# Altium PCB 20通道传感器-蓝牙主机.PcbDoc (part 1 of 2)
Units mil, origin at the board's own origin, x right, y up, seen from the top; angles counter-clockwise.
Board outline 5314.97 x 3394.43 mil, 2 copper layers (Top Layer, Bottom Layer); 93 components, 99 nets, 352 pads, 927 vias.
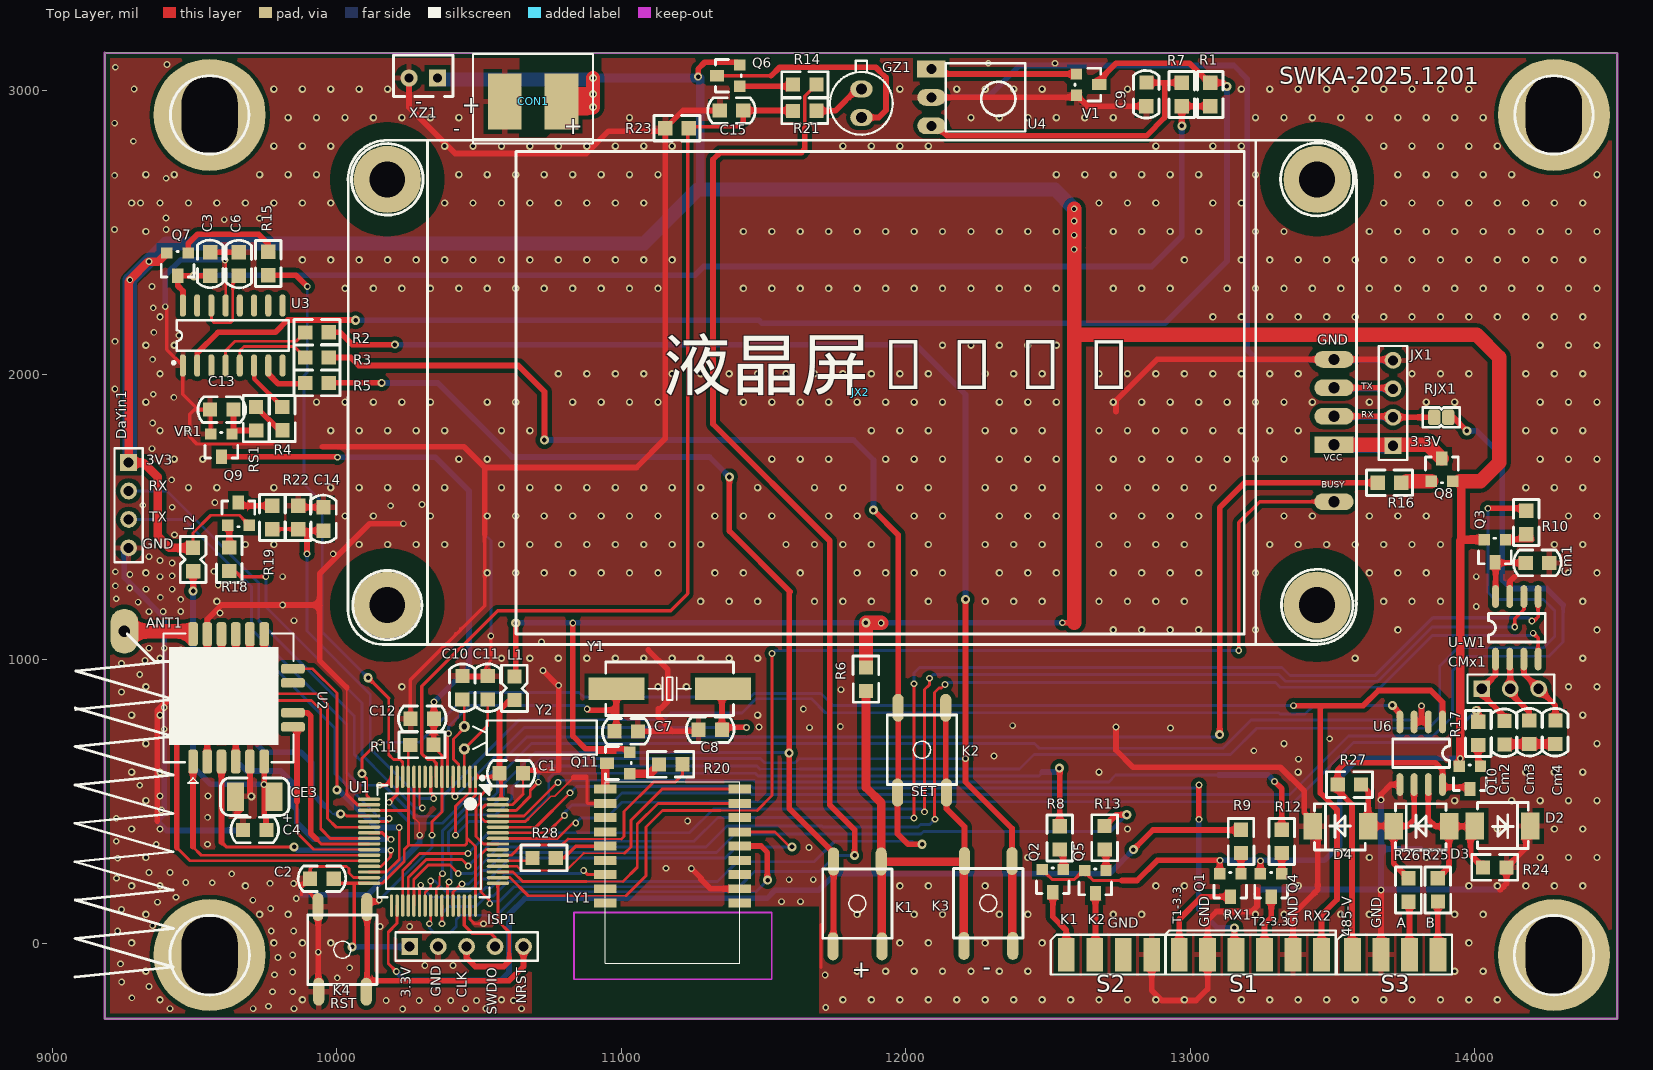
[diagram p0: Top Layer view]
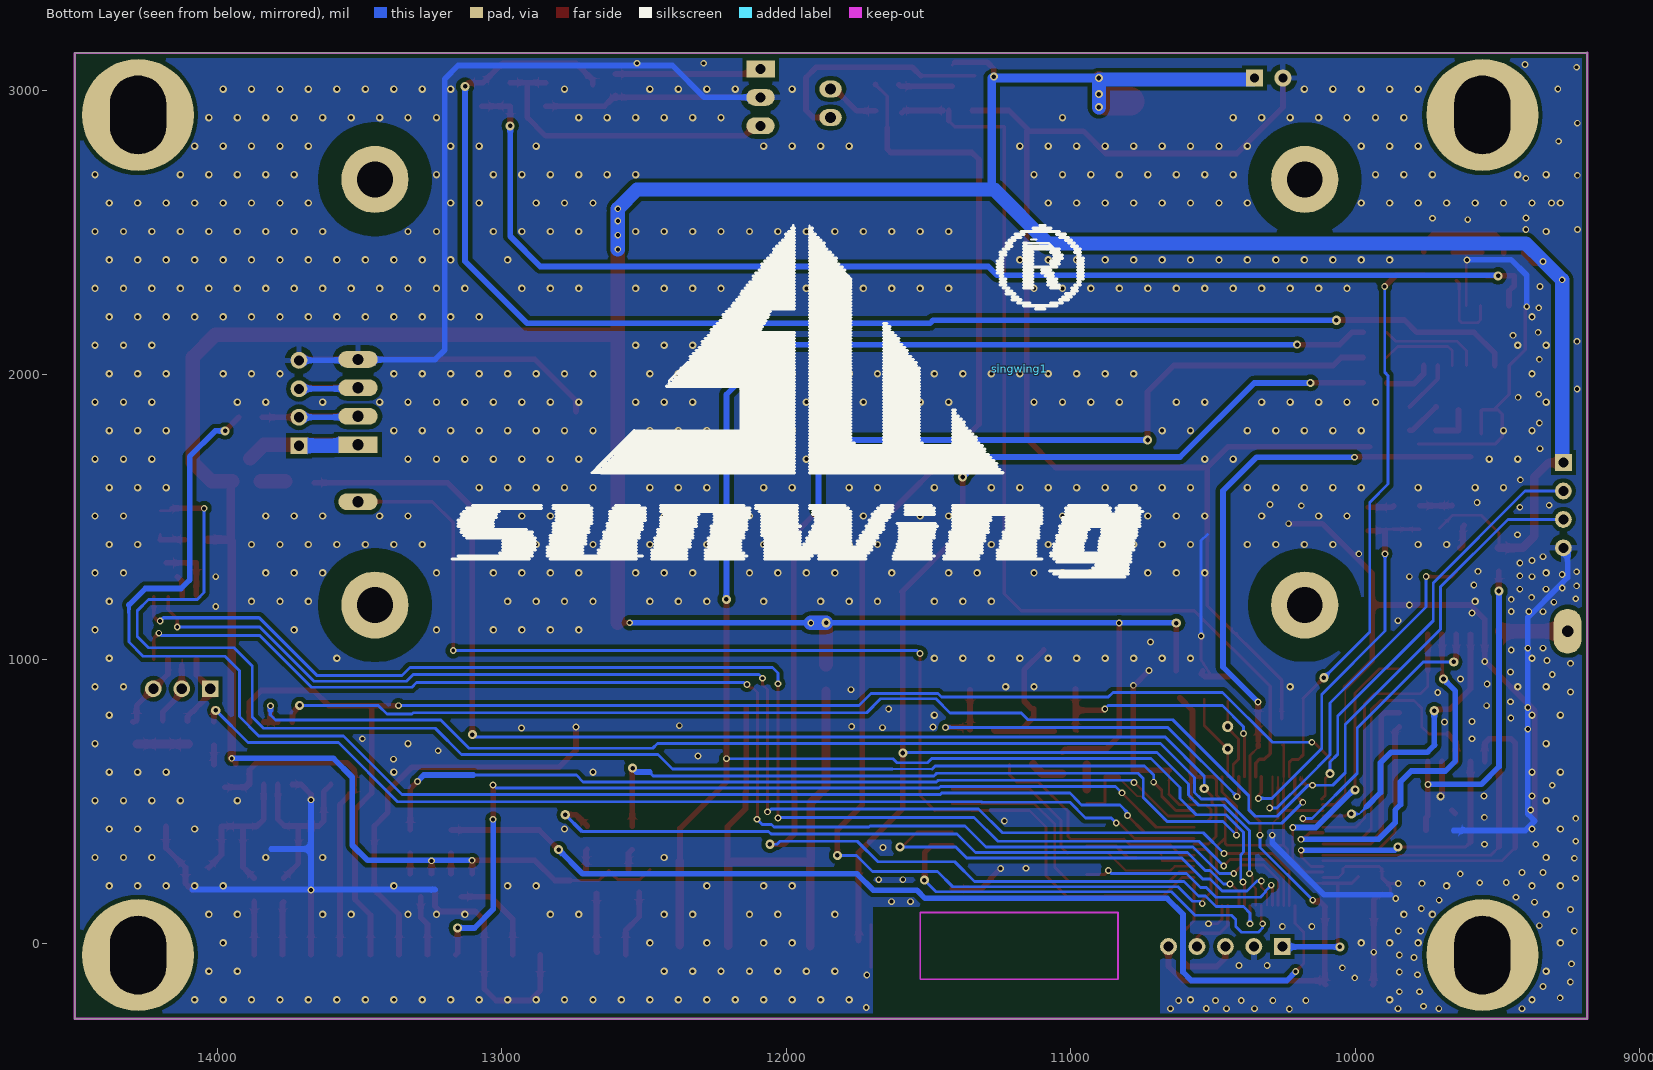
[diagram p1: Bottom Layer view, seen from below]
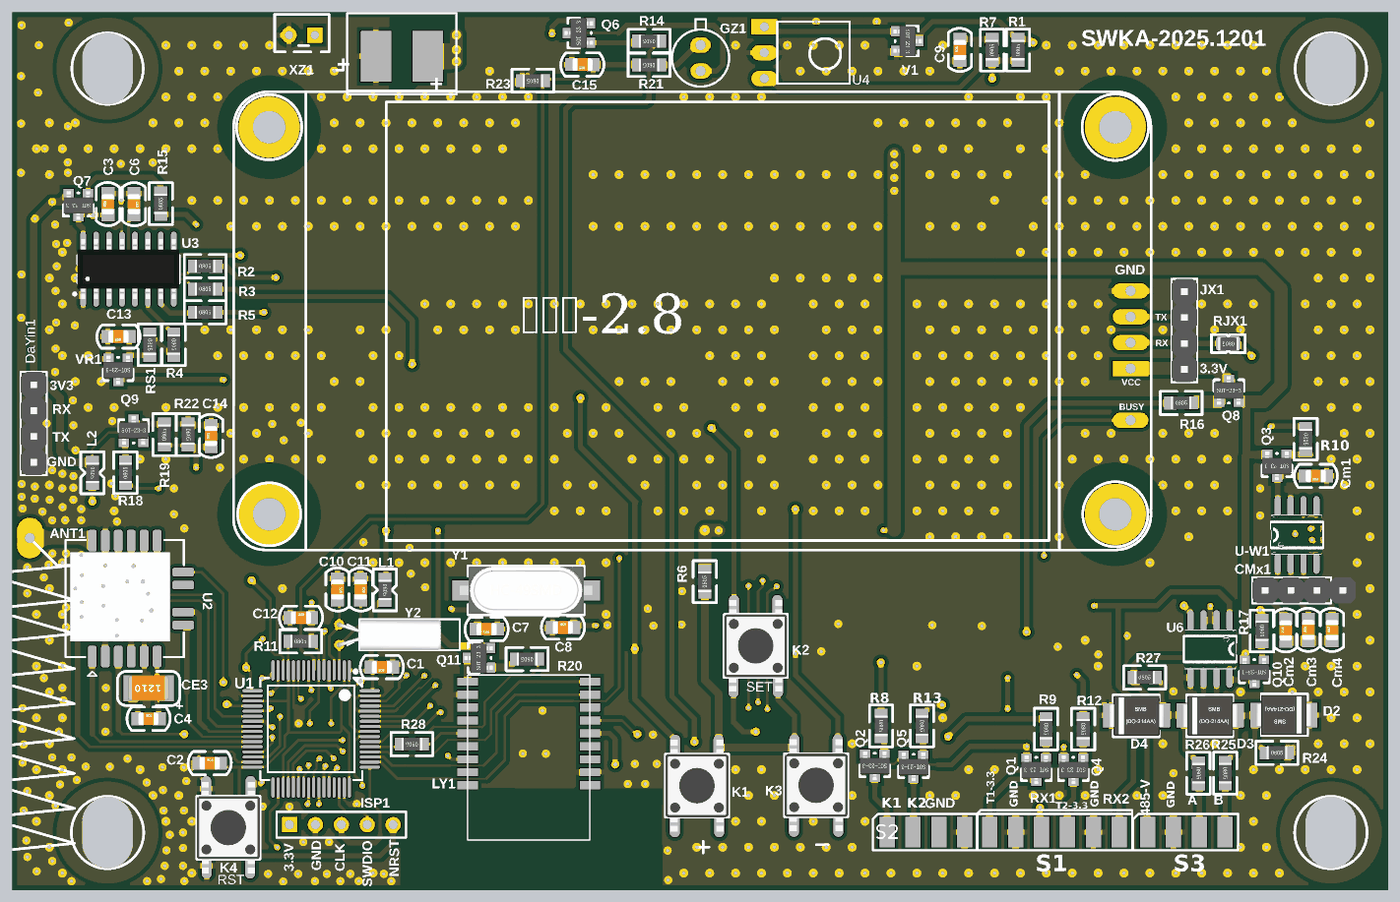
[diagram p3: 3D render of the assembled board from above, using the file's embedded part models]

## Layer stack, top to bottom
Top Solder: solder mask 0.4, Solder Resist, Dk 3.5
Top Layer: signal copper 1.4
Dielectric1: dielectric 12.6, FR-4, Dk 4.8
Bottom Layer: signal copper 1.4
Bottom Solder: solder mask 0.4, Solder Resist, Dk 3.5

## Board outline
9185.03,-263.71 14500,-263.71 14500,3130.3 9185.44,3130.3 9185.03,3130.72

## Design rules (kind name [scope] priority, off if disabled: settings)
Clearance [All] p1: gap=15 ignorepadtopadclearanceinfootprint=FALSE
ComponentClearance [All] p1: gap=10 collisioncheckmode=3 verticalgap=100000 showdistances=FALSE
DiffPairsRouting [All] p1: maxlimit=30 minlimit=20 mostfreqgap=20 toplayer_minwidth=15 toplayer_maxwidth=15 toplayer_prefwidth=15 bottomlayer_minwidth=15 bottomlayer_maxwidth=15 bottomlayer_prefwidth=15 substack1={B24A9CE2-429F-42C9-BC47-D9FC162F9FF9} toplayer_{b24a9ce2-429f-42c9-bc47-d9fc162f9ff9}_minwidth=15 toplayer_{b24a9ce2-429f-42c9-bc47-d9fc162f9ff9}_maxwidth=15 toplayer_{b24a9ce2-429f-42c9-bc47-d9fc162f9ff9}_prefwidth=15 bottomlayer_{b24a9ce2-429f-42c9-bc47-d9fc162f9ff9}_minwidth=15 bottomlayer_{b24a9ce2-429f-42c9-bc47-d9fc162f9ff9}_maxwidth=15 bottomlayer_{b24a9ce2-429f-42c9-bc47-d9fc162f9ff9}_prefwidth=15 substack2={82238B30-984B-4E9E-A5AC-798FF285C955} toplayer_{82238b30-984b-4e9e-a5ac-798ff285c955}_minwidth=15 toplayer_{82238b30-984b-4e9e-a5ac-798ff285c955}_maxwidth=15 toplayer_{82238b30-984b-4e9e-a5ac-798ff285c955}_prefwidth=15 bottomlayer_{82238b30-984b-4e9e-a5ac-798ff285c955}_minwidth=15 bottomlayer_{82238b30-984b-4e9e-a5ac-798ff285c955}_maxwidth=15 bottomlayer_{82238b30-984b-4e9e-a5ac-798ff285c955}_prefwidth=15 maxuncoupledlength=500
HoleSize [IsVia] p1: absolutevalues=TRUE maxlimit=300 minlimit=12 maxpercent=80.000 minpercent=20.000
LayerPairs LayerPairs_1 [All] p1: enforce=TRUE
LayerPairs [All] p2: enforce=TRUE
MinimumSolderMaskSliver [All] p1: minsoldermaskwidth=3
PlaneConnect [All] p1: planeconnectstyle=Relief reliefexpansion=20 reliefentries=4 reliefconductorwidth=20 reliefairgap=20
PolygonConnect [All] p1: thpad.connectstyle=Relief thpad.reliefconductorwidth=20 thpad.reliefentries=4 thpad.polygonreliefangle="90 Angle" thpad.airgapwidth=20 smdpad.connectstyle=Relief smdpad.reliefconductorwidth=20 smdpad.reliefentries=4 smdpad.polygonreliefangle="90 Angle" smdpad.airgapwidth=15 via.connectstyle=Direct via.reliefconductorwidth=30 via.reliefentries=4 via.polygonreliefangle="90 Angle" via.airgapwidth=30
RoutingVias [All] p1: holewidth=13.78 width=32 viastyle="Through Hole" minholewidth=8 minwidth=12 maxholewidth=16 maxwidth=32
SMDToCorner [All] p1: distance=30000
SilkToSilkClearance [All] p1: silktosilkclearance=20
SilkToSolderMaskClearance SilkscreenOverComponentPads [IsPad] p1 off: minsilkscreentomaskgap=1 clearancetoexposedcopper=FALSE
SolderMaskExpansion [All] p1: expansion=4 istentingtop=FALSE
Width Width_2 [InNet('3V3')] p1: maxlimit=500 minlimit=6 preferedwidth=50 substack1={B24A9CE2-429F-42C9-BC47-D9FC162F9FF9} substack2={82238B30-984B-4E9E-A5AC-798FF285C955} minimp=50.000000 maximp=50.000000 favimp=50.000000
Width Width_1 [InNet('3V3-MCU')] p2: maxlimit=50 minlimit=6 preferedwidth=30 substack1={B24A9CE2-429F-42C9-BC47-D9FC162F9FF9} substack2={82238B30-984B-4E9E-A5AC-798FF285C955} minimp=50.000000 maximp=50.000000 favimp=50.000000
Width [All] p3: maxlimit=100 minlimit=2 preferedwidth=20 substack1={B24A9CE2-429F-42C9-BC47-D9FC162F9FF9} substack2={82238B30-984B-4E9E-A5AC-798FF285C955} minimp=50.000000 maximp=50.000000 favimp=50.000000
22 further rules are at their usual default settings.

## Components (designator, comment, footprint, x,y, rotation, side; value= is the part's Value field where it differs from the comment)
ANT1 "490MHz" TX-470-B 9253.56,1098.06 r270 top
C1 "104" 0805C 10615.44,601.06 r180 top
C2 "104" 0805C 9945.53,225.88 r0 top
C3 "104" 0805C 9557.53,2386.27 r90 top
C4 "104" 0805C 9709.46,397.37 r0 top
C6 "104" 0805C 9653.63,2390.97 r270 top
C7 "20pf" 0805C 11020,747.97 r180 top
C8 "20pf" 0805C 11310,750 r0 top
C9 "104" 0805C 12847.29,2982.32 r90 top
C10 "20pf" 0805C 10439.6,901.84 r270 top
C11 "20pf" 0805C 10528.81,901.84 r270 top
C12 "104" 0805C 10297.99,788.1 r0 top
C13 "104" 0805C 9598.42,1878.81 r180 top
C14 "104" 0805C 9955.33,1490 r90 top
C15 "104" 0805C 11390,2930 r180 top
CE3 "6V/22UF" 1210C 9712.15,516.74 r180 top
Cm1 "104" 0805C 14222.24,1340 r180 top
Cm2 "10pf" 0805C 14105.58,738.55 r90 top
Cm3 "10pf" 0805C 14192.72,740.6 r90 top
Cm4 "10pf" 0805C 14284.73,740.32 r90 top
CMx1 "" HDR1X3 14174.15,895.92 r0 top
CON1 "2.54-2" 5.08HEADER1X2 10690,2970 r180 top
D2 "SMBJ68CA" SMB 14096.5,413.17 r180 top
D3 "SMBJ68CA" SMB 13811.75,412.4 r0 top
D4 "SMBJ68CA" SMB 13527.86,412.4 r0 top
DaYin1 "" HDR1X4 9268.6,1540.8 r270 top
GZ1 "3DU33" 3DU33 11843.86,2953.3 r270 top
ISP1 "Header 5" HDR1X5 10256.36,-10 r0 top
JX1 "SIP4" HDR1X4 13712.34,1899.93 r90 top
JX2 "YJP-28" YJP-28 13504.55,1913.34 r0 top locked
K1 "KEY-SO4" KEY-6X6 11830,139.59 r270 top
K2 "KEY-SO4" KEY-6X6 12056.86,680 r270 top
K3 "KEY-SO4" KEY-6X6 12290.04,141.18 r270 top
K4 "KEY-SO4" KEY-6X6 10020,-20 r90 top
L1 "101-Bead" 0805L 10624.76,897.28 r270 top
L2 "101-Bead" 0805L 9495.32,1350 r270 top
LY1 "mx_02" MX_02 10943.92,574.39 r270 top
Q1 "SI2301DS" SOT-23-123 13140.39,205.18 r180 top
Q2 "SI2301DS" SOT-23-123 12516.4,220.67 r180 top
Q3 "SI2301DS" SOT-23-123 14070,1380 r180 top
Q4 "SI2301DS" SOT-23-123 13283.67,205.18 r180 top
Q5 "SI2301DS" SOT-23-123 12665.93,216.9 r180 top
Q6 "SI2301DS" SOT-23-123 11376.53,3050.25 r90 top
Q7 "SI2301DS" SOT-23-123 9440.74,2387.27 r180 top
Q8 "SI2301DS" SOT-23-123 13884.02,1664.9 r0 top
Q9 "SI2301DS" SOT-23-123 9654.39,1510.36 r0 top
Q10 "SI2301DS" SOT-23-123 13982.3,583.21 r180 top
Q11 "SI2301DS" SOT-23-123 10990,634.76 r90 top
R1 "103" 0805R 13069.9,2984.47 r90 top
R2 "102" 0805R 9930.48,2148.35 r0 top
R3 "102" 0805R 9930.83,2060.1 r0 top
R4 "102" 0805R 9808.93,1845.25 r270 top
R5 "102" 0805R 9930.48,1970.61 r0 top
R6 "101" 0805R 11859.96,929.52 r90 top
R7 "101" 0805R 12969.9,2984.47 r90 top
R8 "101" 0805R 12540.97,371.68 r270 top value=102
R9 "101" 0805R 13178,359.38 r270 top
R10 "101" 0805R 14180.47,1480 r270 top value=102
R11 "103" 0805R 10299.4,698.68 r0 top
R12 "101" 0805R 13321.17,359.38 r270 top
R13 "101" 0805R 12698.77,372.02 r270 top value=102
R14 "101" 0805R 11645.02,3019.12 r180 top value=102
R15 "101" 0805R 9759.32,2390.45 r90 top value=102
R16 "101" 0805R 13700,1620 r0 top value=102
R17 "101" 0805R 14011.48,738.83 r270 top value=102
R18 "101" 0805R 9622.5,1350.65 r90 top
R19 "10K" 0805R 9773.21,1497.87 r90 top
R20 "101" 0805R 11173.56,630 r180 top
R21 "103" 0805R 11644.67,2926.67 r180 top value=102
R22 "10K" 0805R 9864.57,1497.87 r270 top
R23 "105" 0805R 11196,2865.71 r180 top value=102
R24 "472" 0805R 14070,267.88 r0 top
R25 "005" 0805R 13869.83,188.96 r270 top value=PTC
R26 "005" 0805R 13766.31,188.61 r270 top value=PTC
R27 "472" 0805R 13558.89,559.06 r0 top
R28 "100k" 0805R 10728.85,301.36 r180 top value=102
RJX1 "0R" DJ6MIL 13881.79,1849.74 r180 top value=0
RS1 "103" 0805R 9716.68,1844.9 r270 top
S1 "CON6" 2.54-S-6 12960.75,-38.5 r0 top
S2 "2.54-s-4" 2.54-S-4 12564.11,-38.5 r0 top
S3 "5.08-4" 2.54-S-4 13569.83,-38.5 r0 top
singwing1 "SUNWING" SUNWING 11180,2020 r180 bottom locked
U1 "STM32l051R8T6" LQFP-64_L10.0-W10.0-P0.50-LS12.0-BL 10340.1,360.13 r180 top
U2 "SX1268" RF 9625,868.9 r90 top
U3 "HS9149" SOP16 9634.42,2137.27 r90 top value=hs9149
U4 "HS38BD" HS/VS1838 12090,2974.11 r270 top
U6 "rs3485" SOP8 13811.31,669.06 r270 top
U-W1 "BS813A-1" SOP8 14147.24,1110 r90 top
V1 "9014" SOT-23-123 12640,3018.82 r270 top
VR1 "9014" SOT-23-123 9594.46,1751.24 r180 top
XZ1 "2.54-2" 2.54-2 10354.08,3042.22 r180 top
Y1 "8MHZ" "OSC HC-49SMD" 11170,895.92 r0 top
Y2 "32.768khz" OSC-3X8-WI-B 10448.37,723.84 r90 top

## Footprints (in the part's own frame and the unit in brackets; to place one, negate y for a bottom-side part, rotate by r counter-clockwise, add the part's x,y. Pads: shape width x height; smd on the part's side, far side on the other; paste and mask are expansions set on the pad)
2.54-2 [mil]
  rect 60x60 hole 32.28 mask+4: 1(0,0)
  round 60 hole 32.28 mask+4: 2(100,0)
  silkscreen extent -55,-80 155,65
2.54-S-4 [mm]
  rect 1.5x3 smd: 1(0,0) 2(2.54,0) 3(5.08,0) 4(7.62,0)
  silkscreen extent -1.4,-1.78 8.89,1.78
2.54-S-6 [mm]
  rect 1.5x3 smd: 1(0,0) 2(2.54,0) 3(5.08,0) 4(7.62,0) 5(10.16,0) 6(12.7,0)
  silkscreen extent -1.27,-1.78 13.97,2.16
3DU33 [mm]
  oval 1.5x2 hole 1 mask+0.102: 1(-1.27,0) 2(1.27,0)
  silkscreen extent -3.81,-2.8 2.8,2.8
5.08HEADER1X2 [mm]
  rect 3x5 smd: 1(-2.54,0.254) 2(2.54,0.254)
  silkscreen extent -5.36,-3.99 5.36,4.01
0805C [mil]
  rect 50x50 smd: 1(-39,2) 2(43.7,1.9)
  silkscreen extent -81,-43 86,47, body extent -37,-22 42,27, height 30
0805L [mil]
  rect 50x50 smd: 1(-41.15,-0.1) 2(41.15,0.1)
  silkscreen extent -81,-45 81,45, body extent -40,-25 39,25, height 22
0805R [mil]
  rect 50x50 smd: 1(-41.15,-0.1) 2(41.15,0.1)
  silkscreen extent -81,-45 81,45, body extent -40,-24 39,25, height 22
1210C [mil]
  rect 60x100 smd: 1(-67.5,0) 2(67.5,0)
  silkscreen extent -120,-66 121,66, body extent -78,-50 79,48, height 67
DJ6MIL [mil]
  rrect50% 44x55 smd: 1(-25,0) 2(25,0)
  silkscreen extent -65,-35 65,35, body extent -40,-25 39,25, height 22
HDR1X3 [mm]
  rect 1.5x1.5 hole 0.9 mask+0.102: 1(-3.81,0)
  round 1.5 hole 0.9 mask+0.102: 2(-1.27,0) 3(1.27,0)
  silkscreen extent -5.08,-1.27 2.67,1.27, body extent -5.08,-1.27 5.08,1.27, height 8.54
HDR1X4 [mm]
  rect 1.5x1.5 hole 0.9: 1(-3.81,0)
  round 1.5 hole 0.9: 2(-1.27,0) 3(1.27,0) 4(3.81,0)
  silkscreen extent -5.08,-1.27 5.08,1.27, body extent -5.07,-1.27 5.09,1.27, height 8.54
HDR1X5 [mm] "Connector; Header; 5 Position"
  rect 1.5x1.5 hole 0.9 mask+0.102: 1(0,0)
  round 1.5 hole 0.9 mask+0.102: 2(2.54,0) 3(5.08,0) 4(7.62,0) 5(10.16,0)
  silkscreen extent -1.27,-1.27 11.43,1.27
HS/VS1838 [mm]
  rect 1.524x2.54 hole 0.9 mask+0.102: 1(-2.54,0)
  oval 1.5x2.54 hole 0.9 mask+0.102: 2(0,0) 3(2.54,0)
  silkscreen extent -3.05,1.27 3.05,8.38
KEY-6X6 [mm]
  oval 2.5x1 smd: 1(-3.785,-2.13) 2(3.785,-2.181) 3(3.785,2.181) 4(-3.785,2.12)
  silkscreen extent -3.13,-3.1 3.07,3.1, body extent -4.53,-3.1 4.47,3.1, height 4.5
LQFP-64_L10.0-W10.0-P0.50-LS12.0-BL [mm]
  oval 0.3x2 smd: 1(-3.75,-5.75) 2(-3.25,-5.75) 3(-2.75,-5.75) 4(-2.25,-5.75) 5(-1.75,-5.75) 6(-1.25,-5.75) 7(-0.75,-5.75) 8(-0.25,-5.75) 9(0.25,-5.75) 10(0.75,-5.75) 11(1.25,-5.75) 12(1.75,-5.75) 13(2.25,-5.75) 14(2.75,-5.75) 15(3.25,-5.75) 16(3.75,-5.75) 33(3.75,5.75) 34(3.25,5.75) 35(2.75,5.75) 36(2.25,5.75) 37(1.75,5.75) 38(1.25,5.75) 39(0.75,5.75) 40(0.25,5.75) 41(-0.25,5.75) 42(-0.75,5.75) 43(-1.25,5.75) 44(-1.75,5.75) 45(-2.25,5.75) 46(-2.75,5.75) 47(-3.25,5.75) 48(-3.75,5.75)
  oval 2x0.3 smd: 17(5.75,-3.75) 18(5.75,-3.25) 19(5.75,-2.75) 20(5.75,-2.25) 21(5.75,-1.75) 22(5.75,-1.25) 23(5.75,-0.75) 24(5.75,-0.25) 25(5.75,0.25) 26(5.75,0.75) 27(5.75,1.25) 28(5.75,1.75) 29(5.75,2.25) 30(5.75,2.75) 31(5.75,3.25) 32(5.75,3.75) 49(-5.75,3.75) 50(-5.75,3.25) 51(-5.75,2.75) 52(-5.75,2.25) 53(-5.75,1.75) 54(-5.75,1.25) 55(-5.75,0.75) 56(-5.75,0.25) 57(-5.75,-0.25) 58(-5.75,-0.75) 59(-5.75,-1.25) 60(-5.75,-1.75) 61(-5.75,-2.25) 62(-5.75,-2.75) 63(-5.75,-3.25) 64(-5.75,-3.75)
  silkscreen extent -5,-5.79 5,5
MX_02 [mm]
  rect 0.8x2 smd: 1(10.96,12) 2(9.69,12) 3(8.42,12) 4(7.15,12) 5(5.88,12) 6(4.61,12) 7(3.34,12) 8(2.07,12) 9(0.8,12) 10(0.8,0) 11(2.07,0) 12(3.34,0) 13(4.61,0) 14(5.88,0) 15(7.15,0) 16(8.42,0) 17(9.69,0) 18(10.96,0)
  Keep-Out Layer lines w0.152: 17.78,-2.794 11.811,-2.794 11.811,14.859 17.78,14.859 17.78,-2.794
  silkscreen extent 0.15,0 16.35,12
"OSC HC-49SMD" [mm]
  rect 5x2 smd: 1(-4.75,0) 2(4.75,0)
  silkscreen extent -5.7,-2.4 5.7,2.4, body extent -6.5,-2.32 6.5,2.33, height 4.63
OSC-3X8-WI-B [mm] "?"
  round 1 hole 0.5: 1(1,0) 2(-1,0)
  silkscreen extent -1.52,-11.81 1.52,-0.8, body extent -1.5,-10 1.5,0.18, height 3.03
RF [mm]
  rrect50% 2.125x0.85 smd: 1(-5.814,3.302) 2(-5.814,2.032) 3(-5.814,0.762) 4(-5.814,-0.508) 5(-5.814,-1.778) 6(-5.814,-3.048) 11(5.561,-3.048) 12(5.561,-1.778) 13(5.561,-0.508) 14(5.561,0.762) 15(5.561,2.032) 16(5.561,3.302)
  round 0.6 on Mech15 mask+0.051: 2(-5.814,3.302)
  rrect50% 0.85x2.125 smd: 7(-2.727,-5.611) 8(-1.457,-5.611) 9(1.203,-5.611) 10(2.473,-5.611)
  round 0.3 on Mech1 mask+0.25: 7(-0.127,0.127)
  silkscreen extent -7.73,-5.67 5.62,5.93
SMB [mm]
  rect 1.65x2.4 smd: 1(2.475,0) 2(-2.475,0)
  silkscreen extent -2.31,-2.11 2.21,2.01, body extent -2.75,-1.98 2.75,1.92, height 2.45
SOP8 [mil]
  oval 80x24 smd: 1(-110,75) 2(-110,25) 3(-110,-25) 4(-110,-75) 5(110,-75) 6(110,-25) 7(110,25) 8(110,75)
  silkscreen extent -50,-100 50,100, body extent -118,-98 120,100, height 63
SOP16 [mm]
  oval 2x0.55 smd: 1(-2.68,4.445) 2(-2.68,3.175) 3(-2.68,1.905) 4(-2.68,0.635) 5(-2.68,-0.635) 6(-2.68,-1.905) 7(-2.68,-3.175) 8(-2.68,-4.445) 9(2.68,-4.445) 10(2.68,-3.175) 11(2.68,-1.905) 12(2.68,-0.635) 13(2.68,0.635) 14(2.68,1.905) 15(2.68,3.175) 16(2.68,4.445)
  silkscreen extent -2.56,-5 1.36,5.39, body extent -2.94,-4.98 2.97,5, height 1.45
SOT-23-123 [mil]
  rect 40x40 smd: 1(-37.5,-40) 2(37.5,-40)
  rect 40x50 smd: 3(-0.5,40)
  silkscreen extent -57,-45 58,45, body extent -57,-52 57,59, height 47
SUNWING [mil]
  silkscreen extent -1995,-731 434,505
TX-470-B [mm]
  oval 4x2.5 hole 1 mask+0.102: 1(0,0)
  silkscreen extent 0.25,-4.42 30.86,4.45
YJP-28 [mm]
  round 6 hole 3.2 mask+0.102: 0(-84.5,-18.376) 0(-84.5,19.624) 0(-1.5,-18.376) 0(-1.5,19.624)
  rect 3.5x1.5 hole 1 mask+0.102: 1(0,-4.064)
  oval 3.5x1.5 hole 1 mask+0.102: 2(0,-1.524) 3(0,1.016) 4(0,3.556) 5(0,-9.144)
  silkscreen extent -88,-21.88 2,23.12

## Part data
ANT1 R1 R2 R3 R4 R5 R6 R7 R8 R9 R10 R11 R12 R13 R14 R15 R16 R17 R18 R19 R20 R21 R22 R23 R24 R25 R26 R27 R28 RJX1 RS1: library part RES
  ANT1 R9 R11 R18 R20: PCB DECAL=0603R
  R1 R2 R3 R4 R5 R6 R7 R8 R10 R12 R13 R14 R15 R16 R17 R19 R21 R22 R23 R24 R27 R28 RJX1 RS1: PCB DECAL=0805R
  R25 R26: PCB DECAL=005
C1 C2 C3 C4 C6 C7 C8 C9 C10 C11 C12 C13 C14 C15 Cm1 Cm2 Cm3 Cm4: library part CAP, PCB DECAL=0805C
CE3: library part cap-d
CMx1 DaYin1 S2 S3: library part CON4
  CMx1 DaYin1 S3: Comment_1=CON4, PCB DECAL=5.08HEADER1X4
  S2: CON4=CON4, PCB DECAL=2.54-s-4
CON1 XZ1: library part CON2, PCB DECAL=5.08HEADER1X2
D2 D3 D4: library part DIODE, PCB DECAL=DIODESMD
ISP1: "Header, 5-Pin", LatestRevisionDate=17-Jul-2002, LatestRevisionNote="Re-released for DXP Platform.", Publisher="Altium Limited"
JX1 JX2: library part MHDR1X5, "Header, 5-Pin", LatestRevisionDate=17-Jul-2002, LatestRevisionNote="Re-released for DXP Platform.", Publisher="Altium Limited"
K1 K2 K3 K4: library part KEY, PCB DECAL=KEY-4
L1 L2: library part INDUCTOR, PCB DECAL=0805R
Q1 Q2 Q3 Q4 Q5 Q6 Q7 Q8 Q9 Q10 Q11: library part MOFET-P, PCB DECAL=SOT-23
U1: library part stm32l051R8t6_1, ComponentLink1Description="New link", ComponentLink2Description="New link 1"
U4: library part IR-ROMTE, PCB DECAL=INFRARED_RX
U6: library part SN75LBC184, PCB DECAL=SO-8-A
U-W1: library part SOP8, Supplier 1=Digikey
V1 VR1: library part NPN, PCB DECAL=SOT-23
  V1: 2300=9014
Y1 Y2: library part XTAL, "Crystal Oscillator", LatestRevisionDate=17-Jul-2002, LatestRevisionNote="Re-released for DXP Platform.", PackageDescription="Crystal, Thru-Hole; 2 Leads; Body 3.1 x 8.2 mm (Dia.xH)", PackageReference=R38, Published=8-Jun-2000, Publisher="Altium Limited"
GZ1: PCB DECAL=3DU33
LY1: Add into BOM=yes, Convert to PCB=yes, Device=mx_02, Symbol=mx_02
U3: PCB DECAL=SO-16

## Free pads (board coordinates)
  round 393.7 hole 196.85 slot 275.59 at 90 deg mask+4: 0(9553.51,-40.26)
  round 393.7 hole 196.85 slot 275.59 at 90 deg unplated mask+4: 0(9553.51,2912.49) 0(14277.92,-40.26) 0(14277.92,2912.49)

## Via types
v1: diameter 26, hole 13.78, Top Layer to Bottom Layer, 644 vias
v2: diameter 23.62, hole 13.78, Top Layer to Bottom Layer, 242 vias
v3: diameter 32, hole 16, Top Layer to Bottom Layer, 34 vias
v4: diameter 28, hole 16, Top Layer to Bottom Layer, 7 vias

## Nets (pads, with @x,y where several pads share a name; then routed paths per layer and width w, separated by ;. In a path a pad name is that pad's centre, name@x,y a point inside that pad or via, vN(x,y) a via of type N, cw(c..) or ccw(c..) an arc to the next point about the centre after c; other vN are vias at no path point)
3V3: CON1.1 DaYin1.1 L1.1 L2.1 Q1.2 Q2.2 Q3.2 Q4.2 Q5.2 Q6.2 Q7.2 Q8.2 Q9.2 Q10.2 Q11.2 R6.2 XZ1.1 | length 17100.1
  Top Layer w10: 9369.04,1500 9370.71,1500 ; L2.1@9495.22,1391.15 9495.22,1443.7 9557.15,1505.64 9658.33,1505.64 Q9.2@9703.96,1460 ; Q6.2@11406.74,3097.54 Q6.2@11416.53,3087.75 ; Q2.2@12478.9,260.67 12514.67,224.9 12591.77,224.9 12623.77,256.9 12658.77,221.9 12760,221.9
  Top Layer w20: L1.1@10629,959.05 v3(10629,1126.61) ; v2(10829.95,1127.26) 10829.95,729.87 10875.35,684.47 11008.28,684.47 11010.49,682.26 11020,682.26 Q11.2@11030,672.26 ; v4(11269.99,3047.06) 11269.99,3074.09 11293.45,3097.54 Q6.2@11406.74,3097.54 ; v2(12550,1127.9) 12591.77,1127.9 ; 12760,221.9 12812.71,221.9 12883.4,292.59 13102.89,292.59 Q1.2@13102.89,245.18 ; Q4.2@13246.17,245.18 v2(13246.17,291.17) ; Q10.2@13934.5,630 13934.5,637.19 v2(13948.51,651.21)
  Top Layer w30: v2(9272.84,2332.84) v2@9337.27,2397.27 ; v2@9274.2,2331.48 9268.6,2325.87 DaYin1.1@9268.6,1690.8 9268.6,1690 9320.71,1690 9370.71,1640 9370.71,1500 9370.71,1431.91 9411.47,1391.15 L2.1@9495.22,1391.15 ; v2(9340,2397.27) 9373.24,2397.27 Q7.2@9403.24,2427.27 ; 13947.1,1624.9 13952.39,1619.61 13952.39,1420 ; v2(13948.51,651.21) 13948.51,1416.12 13952.39,1420 ; Q3.2@14032.5,1420 13952.39,1420
  Top Layer w50: 10874.57,2960 10901,2960 ; v4(10901,2939.58) 10901,2960 ; v4(10901,3042.23) v4(10901,2985.62) 10901,2960 ; R6.2@11859.96,980.96 v3(11859.96,1127.9) 11912.81,1127.9 v2(11913.45,1127.26) ; 12591.77,1127.9 12591.77,2140 ; v2(12591.77,2440) 12591.77,2200 12591.77,2140 ; v2@12591.77,2450 v2(12591.77,2490) v2(12591.77,2540) v2(12591.77,2582.34) ; 13947.1,1624.9 14020,1624.9 14085.86,1690.76 14085.86,2060.46 14006.32,2140 12591.77,2140
  Top Layer w100: CON1.1@10790,2960 10874.57,2960
  Bottom Layer w10: v3(10629,1126.61) v3@10629.65,1127.26
  Bottom Layer w20: v3@10629.65,1127.26 v2(10829.95,1127.26) v3@11859.96,1127.26 ; 11929.36,1127.9 v2(12550,1127.9) ; v2(13104.14,292.88) 13471.68,292.88 13524.78,345.99 13524.78,584.78 13591.21,651.21 v2(13948.51,651.21)
  Bottom Layer w30: v4(10901,3042.23) 11265.16,3042.23 v4(11269.99,3047.06) ; 11269,2650 11277.56,2658.56 v4@11277.56,3042.23
  Bottom Layer w50: DaYin1.1@9268.6,1690.8 9272.84,1695.04 v2(9272.84,2332.84) v2@9337.27,2397.27 ; v2@9338.64,2398.64 9400.63,2460.63 11079.63,2460.63 11269,2650 11562,2650 12524.11,2650 v2(12591.77,2582.34) ; XZ1.1@10354.08,3042.23 10359.08,3037.23 v4@10901,3037.23 ; v4(10901,2939.58) v4(10901,2985.62) v4@10901,3031.67 ; v3(11859.96,1127.9) 11912.81,1127.9 v2(11913.45,1127.26) ; v2(12591.77,2440) v2(12591.77,2490) v2(12591.77,2540) 12591.77,2570
3V3-485: Q10.3 R27.1 S3.1 U6.8 | length 1201.7
  Top Layer w6: R27.1@13517.74,538.99 R27.1@13517.74,558.96
  Top Layer w20: R27.1@13517.74,538.99 13567.82,488.91 13567.82,-36.49 S3.1@13569.83,-38.5 ; R27.1@13517.74,558.96 13517.74,610.49 13543.15,635.9 13861.12,635.9 13886.31,610.71 U6.8@13886.31,559.06 13895.38,550 Q10.3@13972.5,550
3V3-9149: C3.1 Q7.3 R1.1 R7.1 U3.16 | length 4295.3
  Top Layer w20: U3.16@9459.42,2242.77 9459.42,2294 9441.24,2312.17 Q7.3@9441.24,2347.27 9538.11,2347.27 C3.1@9538.48,2346.9 ; v3(12970,2873.9) R7.1@12970,2943.32 R1.1@13070,2943.32
  Bottom Layer w20: v3@9498.24,2348.96 11258.96,2348.96 11290.02,2380.02 12864.13,2380.02 12970,2485.89 v3(12970,2873.9)
  other v3: 9498,2346.9
3V3-CM: Cm1.2 Q3.3 U-W1.8 | length 230.5
  Top Layer w8: U-W1.8@14065.94,1213.7 U-W1.8@14072.24,1220 ; Q3.3@14070.5,1340 14072.4,1338.1 Q3.3@14072.93,1338.1
  Top Layer w20: U-W1.8@14072.93,1225.34 14072.93,1338.1 Cm1.2@14178.54,1338.1
3V3-MCU: C1.2 C2.2 ISP1.1 L1.2 R11.1 U1.1 U1.13 U1.19 U1.32 U1.48 U1.64 | length 2502.1
  Top Layer w6: R11.1@10250.91,691.24 R11.1@10258.25,698.58 ; 10251.09,468.4 10252.29,469.6 ; U1.13@10251.52,586.5 10251.52,563.74 U1.13@10252.29,563.74 ; R11.1@10258.25,698.58 10253.58,693.92 R11.1@10258.25,698.58
  Top Layer w10: U1.32@10113.73,212.49 10161.28,212.49 10237.49,288.7 10237.49,331.16 10252.29,345.96 ; U1.19@10113.73,468.4 10251.09,468.4 ; U1.13@10251.52,586.5 R11.1@10251.52,700.47 ; U1.13@10252.29,563.74 10252.29,469.6 10252.29,345.96 ; U1.48@10487.74,133.76 10487.74,340.84 10457.06,371.51 ; U1.1@10487.74,586.5 10487.74,521.35 10457.06,490.68 10457.06,371.51 ; 10252.29,345.96 10451.2,345.96 10457.06,351.81 10457.06,371.51
  Top Layer w12: C2.2@9989.23,235.09 10011.83,212.49 10061.52,212.49 ; v3@10050,-11.35 10061.52,0.17 10061.52,212.49 ; U1.32@10113.73,212.49 10061.52,212.49 ; U1.1@10487.74,586.5 C1.2@10564.64,586.5 ; U1.64@10577.51,507.77 C1.2@10577.51,599.16
  Top Layer w20: C1.2@10564.64,586.5 10564.64,604.71 C1.2@10566.4,604.71 ; C1.2@10571.74,599.16 C1.2@10571.74,602.04 ; C1.2@10577.51,599.16 10572.9,601.47 C1.2@10571.74,602.04 ; L1.2@10616.72,864.27 10571.74,819.29 C1.2@10571.74,604.71 ; C1.2@10566.4,604.71 C1.2@10571.74,602.04 ; C1.2@10566.4,604.71 C1.2@10571.74,604.71 ; C1.2@10571.74,602.04 C1.2@10571.74,604.71
  Bottom Layer w20: v3@10050,-15.68 v3(10054.23,-11.35) ISP1.1@10256.36,-11.35
3V3-REMOTE: GZ1.2 Q6.3 | length 833.3
  Top Layer w12: Q6.3@11336.53,3049.75 11526.45,3049.75
  Top Layer w20: 11526.45,3049.75 11556.7,3080 11894.11,3080 11930.4,3043.71 11930.4,2929.06 11904.64,2903.3 GZ1.2@11843.86,2903.3
3V3-RF: C4.2 CE3.1 L2.2 U2.6 | length 1205.3
  Top Layer w20: v3(9495,1239.33) 9495.42,1239.75 L2.2@9495.42,1308.85 ; U2.6@9745,639.98 9745,449.01 9751.14,442.87 C4.2@9751.14,399.48
  Bottom Layer w20: v3(9495,1239.33) 9495,622.02 9557.36,559.66 v2(9744.4,559.66)
3V3-TTL1: Q1.3 S1.1 | length 337.2
  Top Layer w20: S1.1@12960.75,-38.5 12960.75,85.65 13040.28,165.18 Q1.3@13140.89,165.18
3V3-TTL2: Q4.3 S1.4 | length 213.4
  Top Layer w20: S1.4@13260.75,-38.5 13260.75,68.07 13284.17,91.5 Q4.3@13284.17,165.18
3V3-YJP: JX1.1 JX2.1 Q8.3 | length 608.2
  Top Layer w50: JX2.1@13504.55,1753.34 13835.08,1753.34 Q8.3@13883.52,1704.9
  Bottom Layer w20: JX2.1@13504.55,1753.34 JX2.1@13507.96,1749.93
  Bottom Layer w50: JX2.1@13507.96,1749.93 JX1.1@13712.34,1749.93
3V3-控制1: Q2.3 S2.1 | length 238.7
  Top Layer w20: Q2.3@12516.9,180.67 12516.9,94.12 12564.11,46.9 S2.1@12564.11,-38.5
3V3-控制2: Q5.3 S2.2 | length 207.9
  Top Layer w20: S2.2@12664.11,-30 12666.43,-27.68 Q5.3@12666.43,176.9
3V3_ADC: Q9.3 R19.2 | length 114
  Top Layer w20: Q9.3@9659.5,1540 9660.48,1539.02 R19.2@9773.11,1539.02
485-/RE: U1.15 U6.2 U6.3 | length 4131.6
  Top Layer w6: U1.15@10212.15,586.5 U1.15@10212.56,586.08 ; U6.3@13793.59,779.06 13814.95,779.06
  Top Layer w8: U6.3@13786.31,779.06 U6.3@13793.59,779.06
  Top Layer w12: v2(10184.39,496.74) 10212.56,524.89 U1.15@10212.56,586.08
  Top Layer w20: U6.3@13786.31,779.06 U6.2@13836.31,779.06 ; v2(13812.51,835.76) 13812.51,781.5 13814.95,779.06
  Bottom Layer w10: v2(10184.39,496.74) 10258.26,422.88 10371.91,422.88 10456.8,507.77 10541.46,507.77 10564.7,531.01 10564.7,583.95 10684.75,704 12452.06,704 12469.16,686.9 13115.07,686.9 13213.82,785.64 13794.4,785.64 13812.51,803.75
  Bottom Layer w12: 13812.51,803.75 13812.51,819.75
  Bottom Layer w20: 13812.51,819.75 v2(13812.51,835.76)
ANTT: ANT1.1 U2.16 | length 244.4
  Top Layer w6: ANT1.1@9260,1085.58 ANT1.1@9272.48,1098.06 ; U2.16@9484.76,1098.06 U2.16@9495,1087.82
  Top Layer w50: ANT1.1@9272.48,1098.06 U2.16@9484.76,1098.06
CM-OUT-1: U1.35 U-W1.6 | length 4799.3
  Top Layer w10: U1.35@10231.83,133.76 10231.83,257.58 10290.99,316.74 v2(10461.57,316.74) ; v2(12065.71,463.37) 12066.05,463.71 12066.05,892.95 12083.25,910.15 v2(12083.25,932.78)
  Top Layer w12: v2(14140,1113.05) 14140,1141.41 14172.24,1173.65 U-W1.6@14172.24,1220
  Bottom Layer w10: v2(10461.57,316.74) 10534.49,389.66 11239.66,389.66 11323.71,473.71 12052.21,473.71 12062.55,463.37 v2(12065.71,463.37) ; v2(12083.25,932.78) 12095.84,945.37 13310.72,945.37 13334.11,921.98 13658.93,921.98 13850,1113.05 v2(14140,1113.05)
CM-OUT-2: U1.36 U-W1.5 | length 4871.9
  Top Layer w10: U1.36@10251.52,133.76 10251.52,232.66 10314.41,295.55 10439.82,295.55 v2@10462.11,273.26 ; v2(12029.13,441.9) v2(12029.13,913.37)
  Top Layer w12: v2(14200,1133.93) 14208.09,1133.93 14222.24,1148.09 U-W1.5@14222.24,1220
  Bottom Layer w10: v2(10462.25,273.26) 10549,360 11256.1,360 11340,443.9 12027.13,443.9 v2(12029.13,441.9) ; v2(12029.13,913.37) 12029.13,951.74 12048.06,970.67 13322.25,970.67 13349.94,942.98 13650.12,942.98
  Bottom Layer w12: 13650.12,942.98 13852.63,1145.49 14188.45,1145.49 v2(14200,1133.93)
CM-OUT-3: U1.37 U-W1.4 | length 4787.7
  Top Layer w10: U1.37@10271.2,133.76 10271.2,191.48 10270.41,192.27 10270.41,225.3 10321.36,276.26 10397.51,276.26 v2(10427.02,246.74) ; v2(12102.38,437.32) 12100.62,439.07 12100.62,874.96 12101.08,875.42 12101.08,883.08 12116.2,898.2 12125.09,898.2 v2(12138,911.11)
  Top Layer w12: v2(14204.91,1091.11) 14221.95,1074.07 14221.95,1000.29 U-W1.4@14222.24,1000
  Bottom Layer w6: v2@14197.04,1083.24 v2(14204.91,1091.11)
  Bottom Layer w10: v2(10427.02,246.74) 10476.87,246.74 10570.13,340 11298.26,340 11371.43,413.17 11705.33,413.17 11708.41,410.09 12042.31,410.09 12051.39,419.17 12084.23,419.17 v2(12102.38,437.32) ; v2(12138,911.11) 12141.69,911.11 12148.5,917.92 13298.63,917.92 13315.57,900.98 13667.74,900.98 13850,1083.24 v2@14197.04,1083.24
CSN: U1.20 U2.14 | length 1029.2
  Top Layer w6: v3(10013.45,455.79) v3@10027.55,455.79
  Top Layer w10: v3@10027.55,455.79 10034.63,448.71 U1.20@10113.73,448.71
  Top Layer w20: U2.14@9595,1087.82 9595,896.04 9667.46,823.58 9717.15,823.58 v3(9722.29,818.44)
  Bottom Layer w6: 9959.28,482.64 9986.13,455.79 v3(10013.45,455.79)
  Bottom Layer w20: v3(9722.29,818.44) 9722.29,699.33 9721.16,698.2 9746.17,673.19 9873.5,673.19 9911.16,635.54 9911.16,530.76 9959.28,482.64
DIO1: U1.24 U2.4 | length 1082.2
  Top Layer w10: 9673.98,736.88 9741.4,736.88 9766.47,761.95 9766.47,827.56 9793.91,855 9911.16,855 9943.73,822.42 9943.73,403.71 9977.47,369.97 U1.24@10113.73,369.97
  Top Layer w20: U2.4@9645,639.98 9645,707.9 9673.98,736.88
DIO2: U1.25 U2.8 | length 700.4
  Top Layer w10: 9929.08,366.74 9945.53,350.29 U1.25@10113.73,350.29
  Top Layer w20: U2.8@9845.89,811.54 9896.51,811.54 9908.46,799.59 9908.46,387.36 9929.08,366.74
DIO3: U1.26 U2.7@9845.89,761.54 | length 657
  Top Layer w6: 9918.15,331.92 9920,331.92
  Top Layer w8: 9918.15,330.6 U1.26@10113.73,330.6
  Top Layer w10: 9860.07,499.83 9860.07,390 9918.15,331.92
  Top Layer w20: U2.7@9845.89,761.54 9860.07,747.35 9860.07,499.83
GD-9149: R15.1 U1.14 | length 2038.8
  Top Layer w10: 10182.6,861.85 10182.6,664.07 10199.93,646.74 10222.56,646.74 10231.83,637.48 U1.14@10231.83,586.5
  Top Layer w12: v3(10110,934.45) 10182.6,861.85
  Top Layer w20: R15.1@9759.42,2349.3 9856.74,2349.3 v2(9896.54,2309.5)
  Bottom Layer w10: v2(9896.54,2309.5) 9896.54,2008 9884.42,1995.88 9884.42,1615.58 9949.23,1550.77 9949.23,1095.22 v3(10110,934.45)